# Altium PCB 灯带消消乐V1.0.PcbDoc
Units mm, origin at the board's own origin, x right, y up, seen from the top; angles counter-clockwise.
Board outline 80 x 65 mm, 2 copper layers (Top Layer, Bottom Layer), stack 1.571 mm thick; 87 components, 56 nets, 316 pads, 95 vias.
Unrouted connection lines stored in the file: 56.
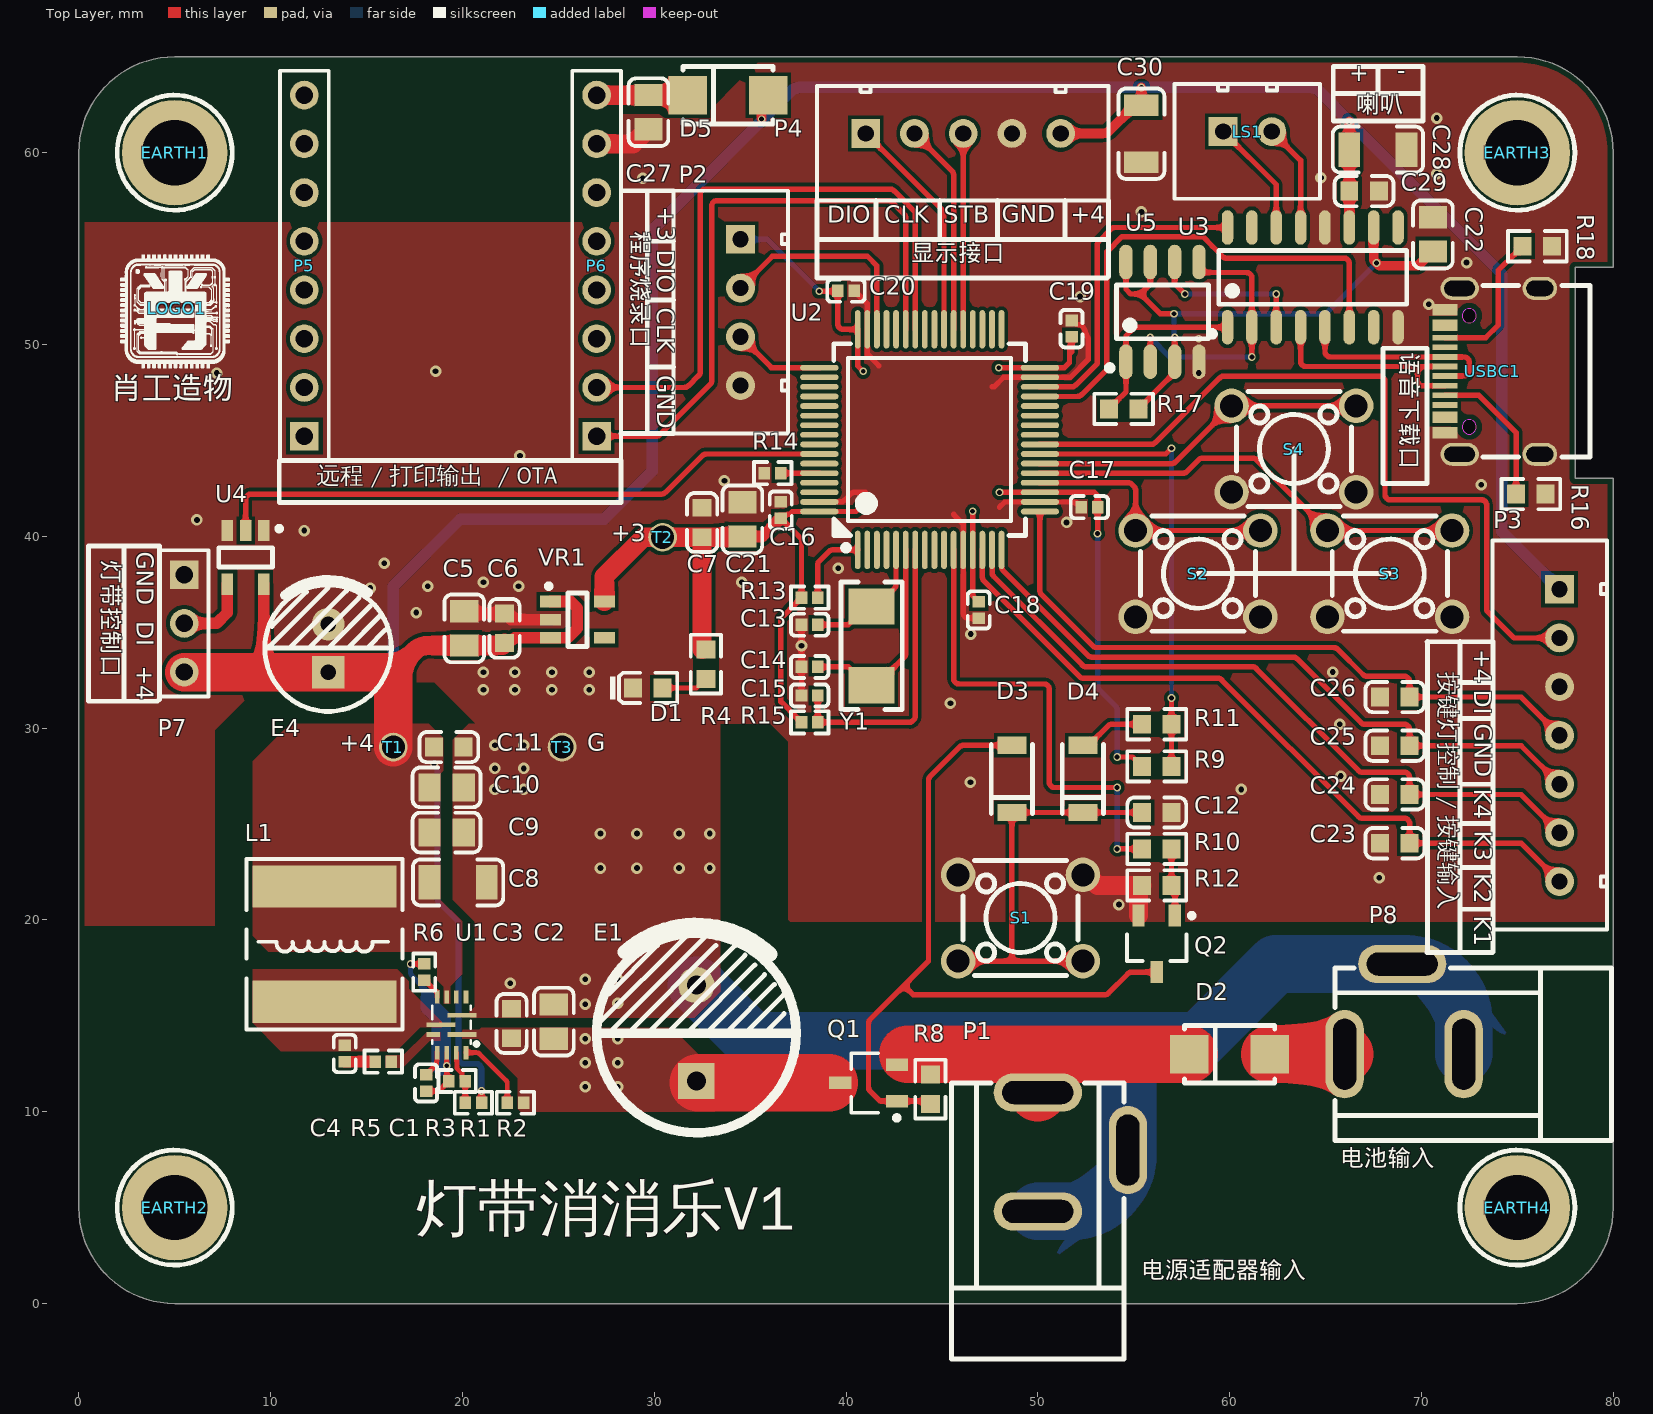
[diagram p0: Top Layer view]
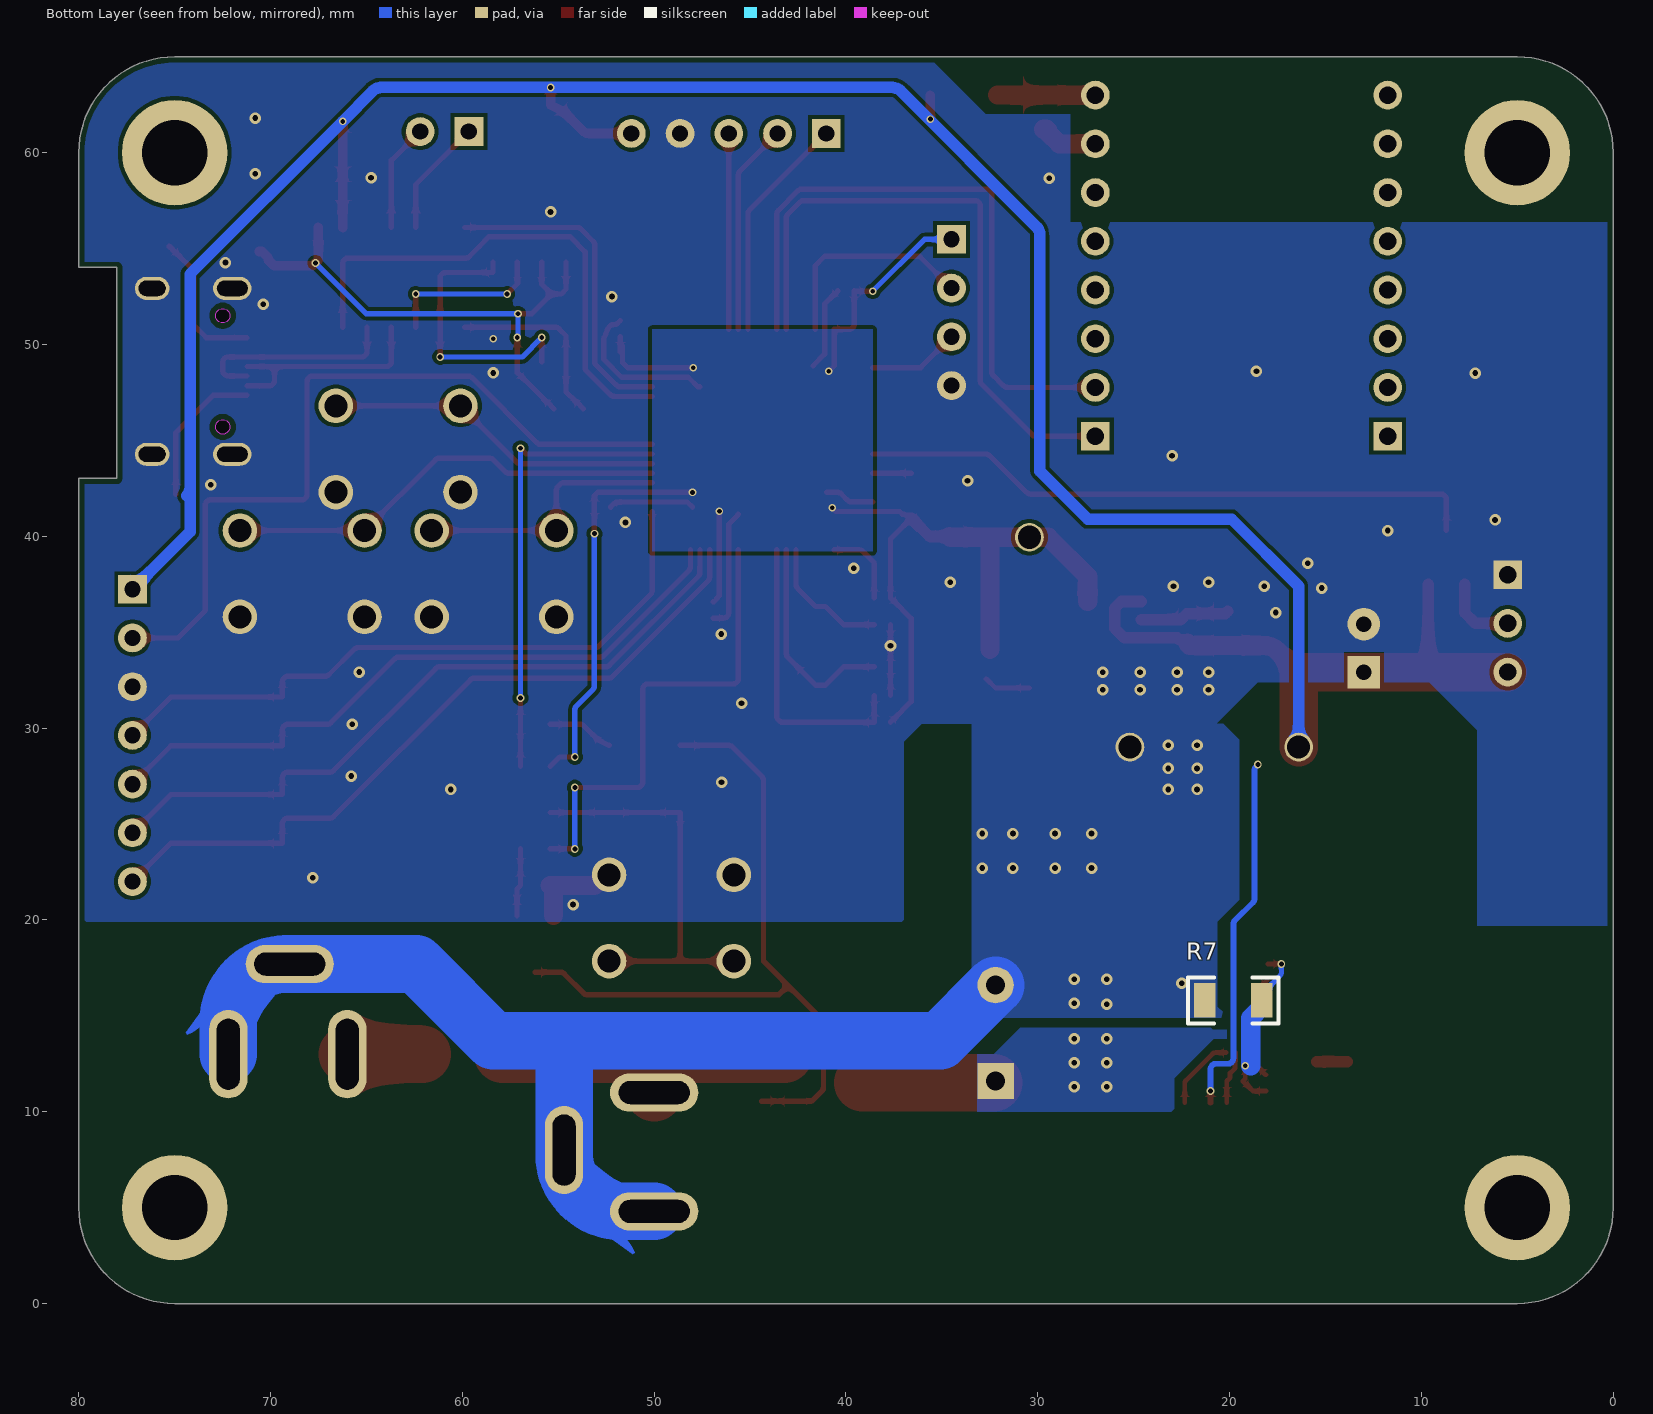
[diagram p1: Bottom Layer view, seen from below]
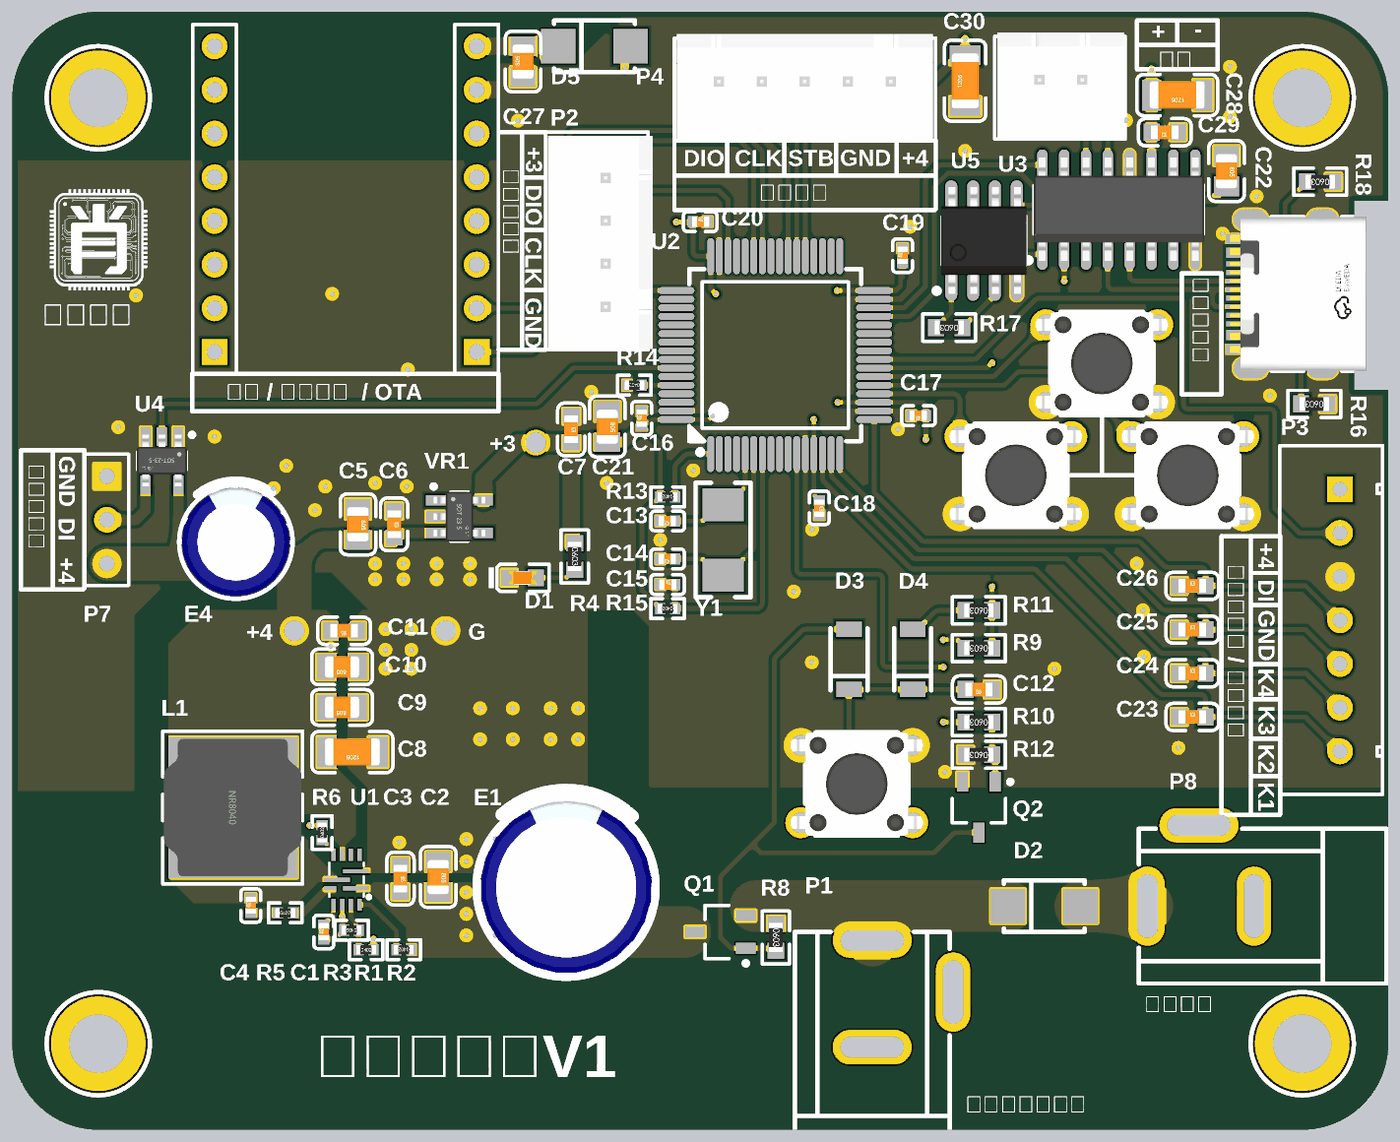
[diagram p2: 3D render of the assembled board from above, using the file's embedded part models]

## Layer stack, top to bottom
Top Solder: solder mask 0.0102, Solder Resist, Dk 3.5
Top Layer: signal copper 0.0356
Dielectric 1: dielectric 1.5, FR-4, Dk 4.8
Bottom Layer: signal copper 0.0356
Bottom Solder: solder mask 0.0102, Solder Resist, Dk 3.5

## Board outline
5,0 cw(c5,5) 0,5 0,60 cw(c5,60) 5,65 75,65 cw(c75,60) 80,60 80,54.015 78.015,54.015 78.015,43.015 80,43.015 80,5 cw(c75,5) 75,0

## Design rules (kind name [scope] priority, off if disabled: settings)
BoardOutlineClearance [All] p1: gap=0.3 ignorepadtopadclearanceinfootprint=FALSE
Clearance [All] p1: gap=0.2 ignorepadtopadclearanceinfootprint=TRUE except(0: Arc-Hole Track-Hole SMDPad-Hole THPad-Hole Via-Hole Text-Hole)
HoleSize [All] p1: absolutevalues=TRUE maxlimit=10 minlimit=0.025 maxpercent=80.000 minpercent=20.000
HoleToHoleClearance [All] p1: gap=0 allowstackedmicrovias=TRUE
MinimumSolderMaskSliver [All] p1: minsoldermaskwidth=0
PlaneConnect PlaneConnectPOWER [InNetClass('POWER')] p1: planeconnectstyle=Direct reliefexpansion=0.508 reliefentries=4 reliefconductorwidth=0.254 reliefairgap=0.254
PolygonConnect PolygonConnect_POWER [InNetClass('POWER')] p1: connectstyle=Direct reliefconductorwidth=0.254 reliefentries=4 polygonreliefangle="90 Angle" airgapwidth=0.254
PolygonConnect PolygonConnect_GND_Via [InNet('GND')] p2: thpad.connectstyle=Relief thpad.reliefconductorwidth=0.254 thpad.reliefentries=4 thpad.polygonreliefangle="90 Angle" thpad.airgapwidth=0.254 smdpad.connectstyle=Relief smdpad.reliefconductorwidth=0.254 smdpad.reliefentries=4 smdpad.polygonreliefangle="90 Angle" smdpad.airgapwidth=0.254 via.connectstyle=Direct via.reliefconductorwidth=0.254 via.reliefentries=4 via.polygonreliefangle="90 Angle" via.airgapwidth=0.254
PolygonConnect PolygonConnect_GNDA_Via [InNet('GNDA')] p3: thpad.connectstyle=Relief thpad.reliefconductorwidth=0.254 thpad.reliefentries=4 thpad.polygonreliefangle="90 Angle" thpad.airgapwidth=0.254 smdpad.connectstyle=Relief smdpad.reliefconductorwidth=0.254 smdpad.reliefentries=4 smdpad.polygonreliefangle="90 Angle" smdpad.airgapwidth=0.254 via.connectstyle=Direct via.reliefconductorwidth=0.254 via.reliefentries=4 via.polygonreliefangle="90 Angle" via.airgapwidth=0.254
PolygonConnect [All] p4: connectstyle=Relief reliefconductorwidth=0.254 reliefentries=4 polygonreliefangle="90 Angle" airgapwidth=0.254
RoomDefinition 灯带消消乐 [InComponentClass('灯带消消乐')] p1: confinementstyle=ConfineIn formatcopy=TRUE lockcomponents=FALSE outline -3.6,-3.9 82.8,-3.9 82.8,67.6 -3.6,67.6
RoutingVias [All] p1: holewidth=0.25 width=0.4 viastyle="Through Hole" minholewidth=0.2 minwidth=0.4 maxholewidth=1 maxwidth=5
SilkToSilkClearance [All] p1: silktosilkclearance=0
SilkToSolderMaskClearance [IsPad] p1: minsilkscreentomaskgap=0 clearancetoexposedcopper=TRUE
SolderMaskExpansion [All] p1: expansion=0.102 istentingtop=FALSE
SupplyNets "Schematic Supply Nets_5" [InNet('VIN')] p1: voltage=0.000
SupplyNets "Schematic Supply Nets_4" [InNet('+4.68V')] p2: voltage=0.000
SupplyNets "Schematic Supply Nets_3" [InNet('GNDA')] p3: voltage=0.000
SupplyNets "Schematic Supply Nets_2" [InNet('GND')] p4: voltage=0.000
SupplyNets "Schematic Supply Nets_1" [InNet('VBTA+')] p5: voltage=0.000
SupplyNets "Schematic Supply Nets" [InNet('+3V3')] p6: voltage=0.000
Width [All] p1: maxlimit=5 minlimit=0.254 preferedwidth=0.28 minimp=50.000000 maximp=50.000000 favimp=50.000000
24 further rules are at their usual default settings.

## Classes and differential pairs
net class POWER: +3V3 +4.68V GND GNDA NetC4_2 NetR5_2 PowerIn VIN

## Components (designator, comment, footprint, x,y, rotation, side; value= is the part's Value field where it differs from the comment)
C1 "2.2uF" 0402_C 18.11,11.5 r90 top
C2 "22uF/25V" 0805_C 24.767,14.695 r270 top
C3 "100nF" 0603_C 22.567,14.6 r270 top
C4 "100nF" 0402_C 13.865,13.035 r90 top
C5 "22uF/25V" 0805_C 20.1,35.2 r270 top
C6 "2.2uF" 0603_C 22.2,35.2 r270 top
C7 "2.2uF" 0603_C 32.5,40.72 r270 top
C8 "100uF/16V" 1206_C 19.775,21.955 r180 top
C9 "22uF/25V" 0805_C 19.175,24.555 r180 top
C10 "22uF/25V" 0805_C 19.175,26.91 r180 top
C11 "100nF" 0603_C 19.295,29.01 r180 top
C12 "100nF" 0603_C 56.2,25.6 r180 top
C13 "20pF" 0402_C 38.105,35.39 r180 top
C14 "20pF" 0402_C 38.105,33.19 r180 top
C15 "100nF" 0402_C 38.105,31.7 r0 top
C16 "100nF" 0402_C 36.6,41.365 r90 top
C17 "100nF" 0402_C 52.691,41.517 r180 top
C18 "100nF" 0402_C 46.919,36.16 r270 top
C19 "100nF" 0402_C 51.762,50.825 r90 top
C20 "100nF" 0402_C 40,52.8 r0 top
C21 "22uF/25V" 0805_C 34.6,40.88 r270 top
C22 "22uF/25V" 0805_C 70.6,55.739 r270 top
C23 "10nF" 0603_C 68.615,24 r0 top
C24 "10nF" 0603_C 68.615,26.54 r0 top
C25 "10nF" 0603_C 68.615,29.08 r0 top
C26 "10nF" 0603_C 68.615,31.62 r0 top
C27 "22uF/25V" 0805_C 29.7,62.11 r90 top
C28 "100uF/16V" 1206_C 67.73,60.16 r180 top
C29 "100nF" 0603_C 67.01,58 r180 top
C30 "100uF/16V" 1206_C 55.4,60.99 r90 top
D1 "白灯 0603" 0603_LED_S1 29.669,32.095 r0 top
D2 "SS54" SMA(DO-214AC)_S1 60,13 r0 top
D3 "1N4148" LL-34 48.65,27.35 r90 top
D4 "1N4148" LL-34 52.35,27.35 r90 top
D5 "SS54" SMA(DO-214AC)_S1 33.85,63 r0 top
E1 "470uF/35V" "CAP 5.0*10*12.5" 32.2,14.1 r90 top
E4 "220uF/16V" "CAP 2.5*6.3*11.2" 13,34.17 r90 top
EARTH1 "EARTH" "Mounting Hole 3.2" 5,60 r0 top
EARTH2 "EARTH" "Mounting Hole 3.2" 5,5 r90 top
EARTH3 "EARTH" "Mounting Hole 3.2" 75,60 r90 top
EARTH4 "EARTH" "Mounting Hole 3.2" 75,5 r90 top
L1 "2.2uH ±10%" NR8040 12.815,18.735 r270 top
LOGO1 "X-LOGO" XLOGO 5.1,51.9 r0 top
LS1 "Speaker" 2.54-2P 59.66,61.1 r270 top
P1 "DC005" DC005 50,11 r90 top
P2 "Debug" DEBUG 34.3,51.1 r180 top
P3 "Header 7" 2.54-7P 77.2,37.24 r180 top
P4 "Header 5" 2.54-5P 41.03,61 r270 top
P5 "Header 8" HDR1X8 11.76,45.22 r90 top
P6 "Header 8" HDR1X8 27,45.22 r90 top
P7 "Header 3" HDR1X3 5.5,38 r270 top
P8 "DC005" DC005 66,13 r180 top
Q1 "AO3401A" SOT-23-3L 41.175,11.5 r0 top
Q2 "AO3400A" SOT-23-3L 56.2,18.75 r90 top
R1 "62K" 0402_R 20.574,10.467 r0 top
R2 "100K" 0402_R 22.765,10.467 r180 top
R3 "10K" 0402_R 19.724,11.6 r180 top
R4 "2K" 0603_R 32.7,33.33 r270 top
R5 "10R" 0402_R 15.87,12.61 r0 top
R6 "NC" 0402_R 18.014,17.279 r90 top
R7 "0R" 1206_R 19.81,15.8 r0 bottom
R8 "20K" 0603_R 44.4,11.175 r270 top
R9 "20K" 0603_R 56.2,28 r180 top
R10 "100Ω" 0603_R 56.2,23.7 r180 top
R11 "100Ω" 0603_R 56.2,30.2 r180 top
R12 "20K" 0603_R 56.2,21.8 r180 top
R13 "100K" 0402_R 38.105,36.8 r180 top
R14 "10K" 0402_R 36.175,43.29 r180 top
R15 "1K" 0402_R 38.105,30.3 r180 top
R16 "5.1K" 0603_R 75.704,42.2 r180 top
R17 "5.1K" 0603_R 54.474,46.64 r180 top
R18 "5.1K" 0603_R 76.044,55.123 r180 top
S1 "KEY" SW-TH_4P-L6.0-W6.0-P4.50-LS6.5 49.1,20.1 r180 top
S2 "KEY" SW-TH_4P-L6.0-W6.0-P4.50-LS6.5 58.35,38.05 r0 top
S3 "KEY" SW-TH_4P-L6.0-W6.0-P4.50-LS6.5 68.35,38.05 r0 top
S4 "KEY" SW-TH_4P-L6.0-W6.0-P4.50-LS6.5 63.35,44.55 r0 top
T1 "Test Point" PLUG 16.4,29.01 r180 top
T2 "Test Point" PLUG 30.439,39.95 r180 top
T3 "Test Point" PLUG 25.2,29.01 r180 top
U1 "SCT2280FPAR" QFN-12_L2.0-W3.0-P0.50-BL 19.335,14.53 r90 top
U2 "STM32F103RCT6" LQFP-64_L10.0-W10.0-P0.50-LS12.0-BL 44.36,45.04 r0 top
U3 "wt2003h4-16s-a01" SOP-16_150mil 64.335,53.5 r0 top
U4 "sn74lvc1g125dbvr" SOT-23-5 8.7,38.9 r90 top
U5 "GD25Q16ETIGR" SOP-8_150mil 56.5,51.7 r0 top
USBC1 "TYPE-C-31-M-12" USB-C_SMD-TYPE-C-31-M-12 73.7,48.6 r90 top
VR1 "SPX3819-3V3" SOT-23-5 26,35.65 r180 top
Y1 "8MHz" SMD-5032_2P 41.33,34.29 r90 top

## Footprints (in the part's own frame and the unit in brackets; to place one, negate y for a bottom-side part, rotate by r counter-clockwise, add the part's x,y. Pads: shape width x height; smd on the part's side, far side on the other; paste and mask are expansions set on the pad)
2.54-2P [mm]
  rect 1.5x1.5 hole 0.85: 1(0,0)
  round 1.5 hole 0.85: 2(0,2.54)
  silkscreen extent -2.48,-2.53 3.5,5.04, body extent -2.7,-2.4 3.4,5, height 7
2.54-5P [mm]
  rect 1.5x1.5 hole 0.85: 1(0,0)
  round 1.5 hole 0.85: 2(0,2.54) 3(0,5.08) 4(0,7.62) 5(0,10.16)
  silkscreen extent -2.48,-2.53 3.5,12.66, body extent -2.7,-2.4 3.4,12.5, height 7
2.54-7P [mm]
  rect 1.5x1.5 hole 0.85: 1(0,0)
  round 1.5 hole 0.85: 2(0,2.54) 3(0,5.08) 4(0,7.62) 5(0,10.16) 6(0,12.7) 7(0,15.24)
  silkscreen extent -2.48,-2.53 3.5,17.74
0402_C [mm]
  rect 0.6x0.65 smd mask+0.051: 1(-0.425,0) 2(0.425,0)
  silkscreen extent -0.97,-0.58 0.97,0.58, body extent -0.48,-0.3 0.52,0.3, height 0.2
0402_R [mm]
  rect 0.6x0.65 smd mask+0.051: 1(-0.425,0) 2(0.425,0)
  silkscreen extent -0.97,-0.58 0.97,0.58, body extent -0.57,-0.27 0.58,0.28, height 0.41
0603_C [mm]
  rect 0.93x0.98 smd: 1(-0.77,0) 2(0.77,0)
  silkscreen extent -1.53,-0.79 1.54,0.79, body extent -0.8,-0.4 0.8,0.4, height 0.3
0603_LED_S1 [mm]
  rect 0.93x0.98 smd: A(0.77,0) K(-0.77,0)
  silkscreen extent -1.97,-0.79 1.54,0.79, body extent -0.8,-0.4 0.8,0.4, height 0.6
0603_R [mm]
  rect 0.93x0.98 smd: 1(-0.77,0) 2(0.77,0)
  silkscreen extent -1.53,-0.79 1.54,0.79, body extent -0.85,-0.4 0.85,0.4, height 0.56
0805_C [mm]
  rect 1.16x1.47 smd: 1(-0.89,0) 2(0.89,0)
  silkscreen extent -1.77,-1.04 1.77,1.04, body extent -1,-0.62 1,0.63, height 0.77
1206_C [mm]
  rect 1.13x1.8 smd: 1(-1.49,0) 2(1.49,0)
  silkscreen extent -2.36,-1.2 2.35,1.2, body extent -1.6,-0.81 1.6,0.79, height 1
1206_R [mm]
  rect 1.13x1.8 smd: 1(-1.49,0) 2(1.49,0)
  silkscreen extent -2.36,-1.2 2.35,1.2, body extent -1.7,-0.86 1.65,0.87, height 0.85
"CAP 2.5*6.3*11.2" [mm] "脚距2.5mm直径6.3mm高度11.2mm"
  rect 1.7x1.7 hole 0.8: A(-1.25,0)
  round 1.7 hole 0.8: K(1.25,0)
  silkscreen extent -3.3,-3.3 3.56,3.3, body extent -3.15,-3.15 3.16,3.15, height 11.23
"CAP 5.0*10*12.5" [mm] "脚距5mm直径10mm高度12.5mm"
  rect 1.9x1.9 hole 1: A(-2.5,0)
  round 1.9 hole 1: K(2.5,0)
  silkscreen extent -5.2,-5.2 5.64,5.2, body extent -5,-5.01 5.01,4.99, height 12.55
DC005 [mm]
  oval 2x4.6 hole 1.2 slot 3.7 at 90 deg: 1(0,0) 2(-6.2,0)
  oval 4.6x2 hole 1.2 slot 3.7 at 0 deg: 3(-3,-4.7)
  silkscreen extent -13.9,-4.5 0.5,4.5
DEBUG [mm]
  rect 1.5x1.5 hole 0.85: 1(-0.2,-4.38)
  round 1.5 hole 0.85: 2(-0.2,-1.84) 3(-0.2,0.7) 4(-0.2,3.24)
  silkscreen extent -2.68,-6.91 3.3,5.74, body extent -2.95,-6.7 3.15,5.7, height 7.15
HDR1X3 [mm] "Connector; Header; 3 Position"
  rect 1.5x1.5 hole 0.9: 1(0,0)
  round 1.5 hole 0.9: 2(2.54,0) 3(5.08,0)
  silkscreen extent -1.27,-1.27 6.35,1.27
HDR1X8 [mm] "Connector; Header; 8 Position"
  rect 1.5x1.5 hole 0.9: 1(0,0)
  round 1.5 hole 0.9: 2(2.54,0) 3(5.08,0) 4(7.62,0) 5(10.16,0) 6(12.7,0) 7(15.24,0) 8(17.78,0)
  silkscreen extent -1.27,-1.27 19.05,1.27
LL-34 [mm]
  rect 0.9x1.5 smd: 1(1.75,0) 2(-1.75,0)
  silkscreen extent -1.8,-1.08 1.8,1.08
LQFP-64_L10.0-W10.0-P0.50-LS12.0-BL [mm]
  oval 0.3x2 smd paste+0.051: 1(-3.75,-5.75) 2(-3.25,-5.75) 3(-2.75,-5.75) 4(-2.25,-5.75) 5(-1.75,-5.75) 6(-1.25,-5.75) 7(-0.75,-5.75) 8(-0.25,-5.75) 9(0.25,-5.75) 10(0.75,-5.75) 11(1.25,-5.75) 12(1.75,-5.75) 13(2.25,-5.75) 14(2.75,-5.75) 15(3.25,-5.75) 16(3.75,-5.75) 33(3.75,5.75) 34(3.25,5.75) 35(2.75,5.75) 36(2.25,5.75) 37(1.75,5.75) 38(1.25,5.75) 39(0.75,5.75) 40(0.25,5.75) 41(-0.25,5.75) 42(-0.75,5.75) 43(-1.25,5.75) 44(-1.75,5.75) 45(-2.25,5.75) 46(-2.75,5.75) 47(-3.25,5.75) 48(-3.75,5.75)
  oval 2x0.3 smd paste+0.051: 17(5.75,-3.75) 18(5.75,-3.25) 19(5.75,-2.75) 20(5.75,-2.25) 21(5.75,-1.75) 22(5.75,-1.25) 23(5.75,-0.75) 24(5.75,-0.25) 25(5.75,0.25) 26(5.75,0.75) 27(5.75,1.25) 28(5.75,1.75) 29(5.75,2.25) 30(5.75,2.75) 31(5.75,3.25) 32(5.75,3.75) 49(-5.75,3.75) 50(-5.75,3.25) 51(-5.75,2.75) 52(-5.75,2.25) 53(-5.75,1.75) 54(-5.75,1.25) 55(-5.75,0.75) 56(-5.75,0.25) 57(-5.75,-0.25) 58(-5.75,-0.75) 59(-5.75,-1.25) 60(-5.75,-1.75) 61(-5.75,-2.25) 62(-5.75,-2.75) 63(-5.75,-3.25) 64(-5.75,-3.75)
  silkscreen extent -5,-5.79 5,5
"Mounting Hole 3.2" [mm]
  round 5.5 hole 3.4: 1(0,0)
  silkscreen extent -3,-3 3,3, body extent -2.8,-2.8 2.8,2.8, height 2.68
NR8040 [mm] "80*80*40电感"
  rect 2.2x7.5 smd: 1(-3,0) 2(3,0)
  silkscreen extent -4.45,-4.06 4.45,4.06, body extent -4,-4 4,4, height 4.1
PLUG [mm]
  round 1.5 hole 1.2: 1(0,0)
QFN-12_L2.0-W3.0-P0.50-BL [mm]
  rect 0.25x1.5 smd: 1(-0.5,-0.65) 2(0.5,-0.65) 7(0,0.45)
  rect 0.7x0.25 smd: 3(1.45,-0.85) 4(1.45,-0.35) 5(1.45,0.15) 6(1.45,0.65) 9(-1.45,0.65) 10(-1.45,0.15) 11(-1.45,-0.35) 12(-1.45,-0.85)
  rect 0.25x0.7 smd: 8(-0.5,0.85)
  silkscreen extent -1.07,-1.47 0.99,0.9
SMA(DO-214AC)_S1 [mm]
  rect 2x2 smd: 1(2.1,0) 2(-2.1,0)
  silkscreen extent -2.35,-1.5 2.35,1.5
SMD-5032_2P [mm]
  rect 1.9x2.4 smd: 1(-2.05,0) 2(2.05,0)
  silkscreen extent -3.32,-1.6 3.32,1.6
SOP-8_150mil [mm]
  oval 0.7x1.8 smd: 1(-1.905,-2.6) 2(-0.635,-2.6) 3(0.635,-2.6) 4(1.905,-2.6) 5(1.905,2.6) 6(0.635,2.6) 7(-0.635,2.6) 8(-1.905,2.6)
  silkscreen extent -2.9,-3.07 2.4,1.4, body extent -2.5,-3.1 2.5,3.1, height 1.75
SOP-16_150mil [mm]
  oval 0.6x1.8 smd: 1(-4.445,-2.6) 2(-3.175,-2.6) 3(-1.905,-2.6) 4(-0.635,-2.6) 5(0.635,-2.6) 6(1.905,-2.6) 7(3.175,-2.6) 8(4.445,-2.6) 9(4.445,2.6) 10(3.175,2.6) 11(1.905,2.6) 12(0.635,2.6) 13(-0.635,2.6) 14(-1.905,2.6) 15(-3.175,2.6) 16(-4.445,2.6)
  silkscreen extent -5.4,-3.1 4.9,1.4, body extent -4.95,-2.97 4.95,3.03, height 1.75
SOT-23-3L [mm] "http://www.aosmd.com/res/packaging_information/SOT-23-3L.pdf"
  rect 1.15x0.65 smd: 1(1.475,-0.95) 2(1.475,0.95) 3(-1.475,0)
  silkscreen extent -0.9,-1.95 1.6,1.55, body extent -0.9,-1.55 0.9,1.55, height 1.25
SOT-23-5 [mm]
  rect 1.1x0.6 smd: 1(1.4,-0.95) 2(1.4,0) 3(1.4,0.95) 4(-1.4,0.95) 5(-1.4,-0.95)
  silkscreen extent -0.5,-1.88 1.62,1.4, body extent -1.5,-1.45 1.51,1.45, height 1.25
SW-TH_4P-L6.0-W6.0-P4.50-LS6.5 [mm]
  round 1.8 hole 1.2: 1(-3.25,2.25) 2(3.25,2.25) 3(-3.25,-2.25) 4(3.25,-2.25)
  silkscreen extent -3,-3 3,3, body extent -4.11,-3 4.11,3, height 4.9
USB-C_SMD-TYPE-C-31-M-12 [mm]
  oval 1.2x2 hole 0.8 slot 1.6 at 90 deg: 0(-4.325,1.706) 1(4.325,1.706)
  oval 1.2x1.8 hole 0.8 slot 1.4 at 90 deg: 2(4.325,-2.474) 3(-4.325,-2.474)
  rect 0.3x1.3 smd paste-100 mask+0.051: A1(-3.35,2.474) A4(-2.55,2.474) A5(-1.25,2.474) A6(-0.25,2.474) A7(0.25,2.474) A8(1.25,2.474) A9(2.55,2.474) A12(3.35,2.474) B1(3.05,2.474) B4(2.25,2.474) B5(1.75,2.474) B6(0.75,2.474) B7(-0.75,2.474) B8(-1.75,2.474) B9(-2.25,2.474) B12(-3.05,2.474)
  Keep-Out Layer board cut-out: 2.9,1.581 2.826,1.579 2.69,1.521 2.587,1.416 2.531,1.28 2.531,1.132 2.587,0.995 2.69,0.89 2.826,0.832 2.9,0.831 2.974,0.832 3.109,0.89 3.213,0.995 3.269,1.132 3.269,1.279 3.213,1.416 3.109,1.521 2.974,1.579 2.9,1.581 2.9,1.581
  Keep-Out Layer board cut-out: -2.9,1.581 -2.974,1.579 -3.109,1.521 -3.213,1.416 -3.269,1.28 -3.269,1.132 -3.213,0.995 -3.109,0.89 -2.974,0.832 -2.9,0.831 -2.826,0.832 -2.691,0.89 -2.587,0.995 -2.531,1.132 -2.531,1.279 -2.587,1.416 -2.69,1.521 -2.826,1.579 -2.9,1.581 -2.9,1.581
  Multi-Layer pour cut-out: 2.9,1.581 2.826,1.579 2.69,1.521 2.587,1.416 2.531,1.28 2.531,1.132 2.587,0.995 2.69,0.89 2.826,0.832 2.9,0.831 2.974,0.832 3.109,0.89 3.213,0.995 3.269,1.132 3.269,1.279 3.213,1.416 3.109,1.521 2.974,1.579 2.9,1.581 2.9,1.581
  Multi-Layer pour cut-out: -2.9,1.581 -2.974,1.579 -3.109,1.521 -3.213,1.416 -3.269,1.28 -3.269,1.132 -3.213,0.995 -3.109,0.89 -2.974,0.832 -2.9,0.831 -2.826,0.832 -2.691,0.89 -2.587,0.995 -2.531,1.132 -2.531,1.279 -2.587,1.416 -2.69,1.521 -2.826,1.579 -2.9,1.581 -2.9,1.581
  silkscreen extent -4.47,-5.09 4.47,0.49, body extent -4.47,-5 4.47,2.9, height 3.25
XLOGO [mm]
  silkscreen extent -2.93,-3.11 2.77,2.8

## Part data
C1 C2 C3 C4 C5 C6 C7 C8 C9 C10 C11 C12 C13 C14 C15 C16 C17 C18 C19 C20 C21 C22 C23 C24 C25 C26 C27 C28 C29 C30: library part Cap, "贴片电容"
D1: library part "0603 绿灯", "发光二极管", Package=0603, SuppliersPartNumber=C72043, ComponentLink1Description=供应商链接, ComponentLink1URL=http://www.szlcsc.com/product/details_73152.html, Supplier=LC
D2 D3 D4 D5: library part "SMA(DO-214AC) SS54", "二极管", Package=SMA(DO-214AC), SuppliersPartNumber=C22452, ComponentLink1Description=供应商链接, ComponentLink1URL=http://www.szlcsc.com/product/details_23178.html, Supplier=LC
E1 E4: library part ECAP, "电解电容"
EARTH1 EARTH2 EARTH3 EARTH4: library part "Mounting Hole"
L1: library part "1206 10uH 10%", "贴片电感", Package=1206, SuppliersPartNumber=C1051, ComponentLink1Description=供应商链接, ComponentLink1URL=http://www.szlcsc.com/product/details_1403.html, Supplier=LC
LOGO1: library part LOGO
LS1: "Loudspeaker", LatestRevisionDate=17-Jul-2002, LatestRevisionNote="Re-released for DXP Platform.", PackageReference=PIN2, Published=24-Mar-1999, Publisher="Altium Limited"
P2: library part "Header 4", "Header, 4-Pin", LatestRevisionDate=17-Jul-2002, LatestRevisionNote="Re-released for DXP Platform.", Publisher="Altium Limited"
P3: "Header, 7-Pin", LatestRevisionDate=17-Jul-2002, LatestRevisionNote="Re-released for DXP Platform.", Publisher="Altium Limited"
P4: "Header, 5-Pin", LatestRevisionDate=17-Jul-2002, LatestRevisionNote="Re-released for DXP Platform.", Publisher="Altium Limited"
P5 P6: "Header, 8-Pin", LatestRevisionDate=17-Jul-2002, LatestRevisionNote="Re-released for DXP Platform.", Publisher="Altium Limited"
P7: "Header, 3-Pin", LatestRevisionDate=17-Jul-2002, LatestRevisionNote="Re-released for DXP Platform.", Publisher="Altium Limited"
Q1: library part "AO3401A P道沟 X13A15 SOT-23", "MOS(场效应管)", Package=SOT-23, SuppliersPartNumber=C15127, ComponentLink1Description=供应商链接, ComponentLink1URL=http://www.szlcsc.com/product/details_15801.html, Supplier=LC
Q2: library part "AO3400A N道沟 X0YV1T SOT-23", "MOS(场效应管)", Package=SOT-23, SuppliersPartNumber=C20917, ComponentLink1Description=供应商链接, ComponentLink1URL=http://www.szlcsc.com/product/details_21629.html, Supplier=LC
R1 R2 R3 R4 R5 R6 R7 R8 R9 R10 R11 R12 R13 R14 R15 R16 R17 R18: library part Res, "贴片电阻"
S1 S2 S3 S4: library part SWITCH
U1: "功能类型:降压型;工作电压:4.5V~18V;输出电压:600mV~7V;输出电流:8A;输出类型:可调;", Frequency - Switching=400kHz~1.2MHz, JLCPCB Part Class="Extended Part", LCSC Part Name="降压型 8A 4.5V~18V", Manufacturer=SCT(芯洲科技), Operating Temperature=-40℃~+125℃, Output Current=8A, Output Voltage=600mV~7V, Quiescent Current=130uA, Voltage - Supply=4.5V~18V, AddInBom=yes, ConvertToPcb=yes, Datasheet=https://item.szlcsc.com/datasheet/SCT2280FPAR/994012.html, Features=轻载高效模式；内置LDO稳压器；逐波限流；过流保护；输出放电；工作状态指示；打嗝限流, FootprintName=QFN-12_L2.0-W3.0-P0.50-BL, Function=降压型, ManufacturerPart=SCT2280FPAR, ModelId=0ae59447a7924f2e9e6865042a3e138b, ModelName=QFN-12_L2.0-W3.0-P0.50-BL, ModelTransform=118.8974,80.3148,0,0,0,0,0,-4.016,0, Number of Outputs=1, Output Type=可调, Supplier=LCSC, Supplier Footprint=QFN-12(2x3), SupplierPart=C918192, Switch tube (built-in/external)=内置, Symbol=SCT2280FPAR, Synchronous Rectifier=是, Topology=降压式
U2: "CPU内核:ARM-M3;CPU最大主频:72MHz;应用领域:-;", JLCPCB Part Class="Extended Part", LCSC Part Name="主流增强型ARM Cortex-M3 MCU，具有256 KB Flash、72 MHz CPU、电机控制、USB和CAN", Manufacturer=ST(意法半导体), Voltage - Supply=2V~3.6V, ADC (Bit)=12bit, AddInBom=yes, Applications=-, ConvertToPcb=yes, CPU Core=ARM-M3, CPU Maximum Speed=72MHz, DAC (Bit)=12bit, Datasheet=https://item.szlcsc.com/datasheet/STM32F103RCT6/8815.html, Device=STM32F103RCT6, FootprintName=LQFP-64_L10.0-W10.0-P0.50-LS12.0-BL, ManufacturerPart=STM32F103RCT6, ModelId=cd9de06618c44fcf82654c43a457f83c, ModelName=LQFP-64_L10.0-W10.0-H1.4-LS12.0-P0.50, ModelTransform=472.441,472.441,0,0,0,0,0,0,0, Number of I/O=51, Program Memory Type=FLASH, Program Storage Size=256KB, Supplier=LCSC, Supplier Footprint=LQFP-64(10x10), SupplierPart=C8323, Symbol=STM32F103RCT6
U3: library part wt2003h4-16s-a04, "WT2003HX是一款功能强大的高品质语音芯片，采用了高性能32位处理器、最高频率可达120MHz。标准UART通信方式，具有低成本、低功耗、高可靠性、通用性强等特点，可内置350秒语音容量。可通过下载器或者MCU更新语音bin文件，实现语音OTA功能。可搭配 WT WriterV 下载器（适配WT2003H系列、WTV380/WTV890系列、WT3000T系列、WTK6900系列、WT2605A系列、WT2605C系列芯片，实现语音 / 程序的下载与更换）及 WTV-VSB 测试板（适配 WTV 系列", JLCPCB Part Class="Extended Part", LCSC Part Name=WT2003H4-16S-A04, Manufacturer=WT(唯创知音), AddInBom=yes, ConvertToPcb=yes, Datasheet=https://item.szlcsc.com/datasheet/WT2003H4-16S-A04/59048000.html, FootprintName=SOP-16_L10.0-W4.0-P1.27-LS6.0-BL, ManufacturerPart=WT2003H4-16S-A04, ModelId=ee0e272ebf01490fae8942030b5217f4, ModelName=SOP-16_L10.0-W4.0-P1.27-LS6.0-BL, ModelTransform=393.7,236.22,0,0,0,0,0,0,0, Supplier=LCSC, Supplier Footprint=SOP-16, SupplierPart=C55213602, SymbolName=WT2003H4-16S-A04
U4: "输入类型:-;工作电压:1.65V~5.5V;元件数:1;每个元件位数:1;灌电流(IOL):32mA;拉电流(IOH):32mA;", Current - Output High(IOH)=32mA, JLCPCB Part Class="Extended Part", LCSC Part Name=单总线缓冲门，带三态输出, Manufacturer=TI(德州仪器), ManufacturerPart=SN74LVC1G125DBVR, Operating Temperature=-40℃~+125℃, Quiescent Current=10uA, Voltage - Supply=1.65V~5.5V, AddInBom=yes, Channel Type=单向, ConvertToPcb=yes, Current - Output Low(IOL)=32mA, Datasheet=https://www.ti.com/cn/lit/ds/symlink/sn74lvc1g125.pdf, Features=掉电隔离；输出使能, FootprintName=SOT-23-5_L3.0-W1.7-P0.95-LS2.8-BL, Input type=-, Logic Family=74LVC, ModelId=0a2a1b8f50944f73965918ad6e5fe167, ModelName=SOT-23-5_L2.9-W1.6-H1.1-LS2.8-P0.95, ModelTransform=118.60433,114.173,0,90,0,0,0.0005,0.0005,0, Number of Bits per Element=1, Number of Elements=1, Output Type=三态, Propagation Delay=3.7ns@3.3V,15pF, Supplier=LCSC, Supplier Footprint=SOT-23-5, SupplierPart=C23654, Symbol=SN74LVC1G125DBVR
U5: library part W25Q128FVSIG_[C35101], "Flash ROM", Package=SOIC-8, SuppliersPartNumber=C35101, ComponentLink1Description=供应商链接, ComponentLink1URL=http://www.szlcsc.com/product/details_36072.html, Supplier=LC
USBC1: Current Rating - Power (Max)=5A, JLCPCB Part Class="Extended Part", LCSC Part Name="Type-C 母", Manufacturer=韩国韩荣, Operating Temperature Range=-, Add into BOM=yes, Connector Type=Type-C, Contact Material=-, Contact Plating=-, Convert to PCB=yes, Datasheet=https://atta.szlcsc.com/upload/public/pdf/source/20220525/466408E853115E789EDB0DDC29077C05.pdf, Device=TYPE-C-31-M-12, Gender=母, Manufacturer Part=TYPE-C-31-M-12, Mounting Style=-, Name=TYPE-C-31-M-12, Number of Contacts=16P, Number of Ports=1, Standard=-, Supplier=LCSC, Supplier Footprint=SMD, Supplier Part=C165948, Symbol=TYPE-C-31-M-12, Welding Temperature (Max)=-
VR1: library part SPX3819, "LDO-3.3V"
Y1: library part "SMD-5032_2P 8MHz 20ppm 20pF", "贴片晶振", Package=SMD-5032_2P, SuppliersPartNumber=C115962, ComponentLink1Description=供应商链接, ComponentLink1URL=http://www.szlcsc.com/product/details_117214.html, Supplier=LC

## Via types
v1: diameter 0.6, hole 0.3, Top Layer to Bottom Layer, 68 vias
v2: diameter 0.4, hole 0.25, Top Layer to Bottom Layer, 27 vias

## Nets (pads, with @x,y where several pads share a name; then routed paths per layer and width w, separated by ;. In a path a pad name is that pad's centre, name@x,y a point inside that pad or via, vN(x,y) a via of type N, cw(c..) or ccw(c..) an arc to the next point about the centre after c; other vN are vias at no path point)
+3V3: C7.2 C16.1 C17.1 C18.1 C19.1 C20.1 C21.2 P2.1 R4.1 R9.2 R13.2 R15.2 T2.1 U2.13 U2.19 U2.32 U2.48 U2.64 VR1.5 | length 76.6
  Top Layer w0.28: R15.2 37.68,30.325 37.52,30.485 37.495,30.485 36.6,31.38 36.6,35.72 37.495,36.615 37.52,36.615 37.68,36.775 R13.2 37.68,39.86 36.785,40.755 36.785,40.78 36.625,40.94 C16.1 36.76,41.1 36.899,41.1 36.949,41.15 37.066,41.15 37.206,41.29 U2.64 40.516,41.29 v2(40.716,41.49) ; v2(38.61,52.775) 39.55,52.775 C20.1 39.575,51.07 ccw(c39.855,51.07) 39.855,50.79 U2.48 40.61,48.89 v2(40.9,48.6) ; v2(46.6,41.3) 46.61,41.29 U2.13 46.61,36.909 46.734,36.785 46.734,36.745 46.894,36.585 C18.1 ; v2(47.96,48.79) U2.32 51.39,48.79 51.649,49.049 51.649,49.494 ; v2(48.004,42.29) U2.19 52.952,42.29 53.116,42.126 C17.1 v2(53.116,40.14) ; 51.649,49.94 51.649,49.494 ; C19.1 51.762,49.607 51.649,49.494 ; v2(54.136,28.49) 54.94,28.49 R9.2
  Top Layer w0.6: C21.2 35.65,39.99 36.575,40.915 36.575,40.94 C16.1
  Top Layer w1: VR1.5 27.4,37.9 29.45,39.95 T2.1 C7.2 ; R4.1@32.5,34.1 C7.2 ; C21.2 34.56,39.95 C7.2
  Bottom Layer w0.28: P2.1 35.905,55.48 v2(38.61,52.775) ; v2(53.116,40.14) 53.116,32.2 ccw(c53.396,32.2) 53.197,32.003 54.055,31.145 cw(c53.856,30.948) 54.136,30.948 v2(54.136,28.49)
+4.68V: C5.2 C6.2 C8.2 C9.2 C10.2 C11.2 C28.2 C29.2 C30.2 D5.1 E4.A L1.1 P3.1 P4.5 P7.3 R1.2 T1.1 U1.5 U3.11 U4.5 VR1.1 VR1.3 | length 170.4
  Top Layer w0.3: R1.2 v2(20.999,11.083)
  Top Layer w0.5: v2(35.6,61.75) D5.1@35.6,63 ; P4.5 53.378,61 ccw(c53.378,61.5) 53.731,61.146 54.75,62.165 C30.2 v2(55.4,63.4) ; U3.11 C29.2 C28.2 v2(66.24,61.63)
  Top Layer w0.6: 9.65,32.92 U4.5 ; C6.2 22.365,34.595 22.636,34.595 22.741,34.7 VR1.3 25.5,34.7 26,35.2 26,36.249 25.649,36.6 VR1.1
  Top Layer w1: 16.4,32.92 17.498,34.018 cw(c18.204,33.31) 18.204,34.31 C5.2 22.08,34.31 C6.2
  Top Layer w2: P7.3 9.65,32.92 E4.A 16.4,32.92 T1.1
  Bottom Layer w0.3: v2(18.525,28.1) 18.612,28.013 cw(c18.4,27.801) 18.7,27.801 18.7,21.123 ccw(c19,21.124) 18.787,20.913 19.712,19.988 cw(c19.5,19.776) 19.8,19.777 ; 19.8,19.776 19.8,12.798 ccw(c20.1,12.799) 20.098,12.499 20.7,12.499 cw(c20.699,12.199) 20.999,12.199 v2(20.999,11.083)
  Bottom Layer w0.6: T1.1 16.4,37.4 19.9,40.9 27.4,40.9 29.9,43.4 29.9,55.721 cw(c30.5,55.721) 30.075,56.145 37.155,63.225 cw(c37.579,62.8) 37.579,63.4 v2(55.4,63.4) 64.248,63.4 cw(c64.248,62.8) 64.676,63.221 v2(66.24,61.63) 74.2,53.67 74.2,42.531 ; 74.375,42.108 cw(c74.8,42.531) 74.2,42.531 ; P3.1 74.2,40.24 74.2,42.531
DP+: U3.5 USBC1.A6 USBC1.B6 | length 11
  Top Layer w0.28: U3.5 64.97,49.63 ccw(c65.25,49.63) 65.25,49.35 72.214,49.35 cw(c72.214,49.07) 72.494,49.07 72.494,48.638 cw(c72.214,48.638) 72.214,48.358 USBC1.A6@71.233,48.358
DP-: U3.4 USBC1.A7 USBC1.B7 | length 11.8
  Top Layer w0.28: U3.4 63.7,49.13 ccw(c63.98,49.13) 63.979,48.85 69.794,48.85 ; USBC1.B7 70.074,47.85 cw(c70.074,48.13) 69.794,48.13 69.794,48.85 ; USBC1.A7 69.794,48.85
Flash_CLK: U3.3 U5.6 | length 8.4
  Top Layer w0.28: U5.6 57.135,53.165 v2(57.668,52.632) ; U3.3 v2(62.43,52.632)
  Bottom Layer w0.28: v2(57.668,52.632) v2(62.43,52.632)
Flash_CS: R17.2 U3.1 U5.1 | length 9.7
  Top Layer w0.28: R17.2 53.704,46.665 54.029,46.99 54.054,46.99 54.595,47.531 U5.1 54.595,50.455 54.958,50.818 cw(c55.156,50.62) 55.156,50.9 U3.1
Flash_DO: U3.2 U5.2 U5.5 | length 14.6
  Top Layer w0.28: U5.2 v2(55.865,50.36) ; U5.5 58.405,53.75 60.88,53.75 cw(c60.88,53.47) 61.16,53.47 U3.2 v2(61.16,49.35)
  Bottom Layer w0.28: v2(55.865,50.36) 56.875,49.35 v2(61.16,49.35)
GND: C2.1 C3.1 C5.1 C6.1 C7.1 C8.1 C9.1 C10.1 C11.1 C12.1 C13.2 C14.2 C15.1 C16.2 C17.2 C18.2 C19.2 C20.2 C21.1 C22.1 C23.1 C24.1 C25.1 C26.1 C27.1 C28.1 C29.1 C30.1 D1.K E1.K E4.K P1.2 P1.3 P2.4 P3.3 P4.4 P6.7 P7.1 P8.2 P8.3 Q2.2 R7.2 R12.2 R14.2 R16.1 R18.1 S1.3 S1.4 S2.3 S2.4 S3.3 S3.4 S4.3 S4.4 T3.1 U1.2 U2.12 U2.18 U2.31 U2.47 U2.63 U3.8 U3.12 U4.1 U4.3 U5.4 USBC1.0 USBC1.1 USBC1.2 USBC1.3 USBC1.A1 USBC1.A12 USBC1.B1 USBC1.B12 VR1.2 | length 100.9
  Top Layer w0.28: C15.1 C14.2 C13.2 ; U2.63 cw(c38.656,41.514) 38.656,41.794 39.718,41.794 ccw(c39.718,42.074) 39.915,41.876 40.248,42.208 cw(c40.446,42.01) 40.446,42.29 41.001,42.29 ; C20.2 40.425,52.775 40.585,52.615 40.61,52.615 41.11,52.115 U2.47 41.11,49.496 41.716,48.89 ; 45.61,41.14 46.11,40.64 U2.12 46.11,36.015 ccw(c46.39,36.015) 46.39,35.735 C18.2 ; 47.61,47.79 47.724,47.79 48.224,48.29 U2.31 51.699,48.29 52.624,49.215 52.624,50.272 ccw(c52.344,50.272) 52.6,50.386 52.397,50.839 ccw(c52.087,50.7) 52.087,51.04 cw(c52.088,51.32) 51.928,51.09 C19.2 ; 48.004,41.517 48.277,41.79 U2.18 51.992,41.79 52.081,41.702 52.106,41.702 52.266,41.542 C17.2
  Top Layer w0.6: C5.1 20.22,35.97 C6.1 22.225,35.97 22.545,35.65 VR1.2
  Top Layer w1: P6.7 28.879,60.46 29.465,61.046 29.465,61.14 29.545,61.22 C27.1 ; S1.3 52.566,22.35 53.116,21.8 R12.2 55.25,21.62 Q2.2
  Bottom Layer w3: E1.K 35.1,13.7 54.7,13.7 ; P1.2 51.7,4.8 ccw(c51.7,7.8) 54.7,7.8 54.7,13.7 ; P8.2 72.2,14.7 ccw(c69.2,14.7) 69.2,17.7 62.4,17.7 58.4,13.7 54.7,13.7
  other v1: 26.4,15.6 28.1,15.65 22.5,16.7 26.4,16.9 28.1,16.9 54.231,20.8 67.8,22.2 27.2,22.7 29.1,22.7 31.3,22.7 32.9,22.7 27.2,24.5 29.1,24.5 31.3,24.5 32.9,24.5 21.7,26.8 23.2,26.8 60.6,26.8 46.487,27.177 65.8,27.5 21.7,27.9 23.2,27.9 21.7,29.1 23.2,29.1 65.736,30.2 45.443,31.29 21.1,32 22.741,32 24.67,32 26.616,32 21.1,32.918 22.741,32.918 24.67,32.918 26.616,32.918 65.377,32.92 37.68,34.29 46.504,34.904 17.6,36.021 15.2,37.3 18.2,37.4 22.931,37.4 21.1,37.6 34.56,37.6 39.597,38.334 15.929,38.6 11.76,40.3 51.5,40.725 6.161,40.85 73.12,42.69 33.665,42.896 23,44.2 7.2,48.51 58.388,48.518 18.6,48.6 70.376,52.1 52.2,52.5 72.352,54.269 55.4,56.912 29.4,58.67 64.758,58.69 70.8,58.9 70.8,61.806
  other v2: 58.388,50.3
GNDA: C1.1 R3.2 R6.2 R7.1 U1.10 | length 9.6
  Top Layer w0.254: v2(17.3,17.7) 17.304,17.704 R6.2 ; C1.1 18.774,11.075 19.101,11.402 19.126,11.402 19.299,11.575 R3.2 19.185,11.714 v2(19.185,12.397) U1.10
  Bottom Layer w0.254: v2(17.3,17.7) 17.3,17.26 ccw(c17.554,17.26) 17.374,17.081 17.882,16.573 R7.1
  Bottom Layer w1: R7.1 18.32,15.465 18.9,14.885 18.9,12.397
KEY1: C23.2 P3.7 U2.14 | length 38.7
  Top Layer w0.28: U2.14 47.11,37.866 ccw(c47.39,37.866) 47.192,37.668 52.178,32.682 ccw(c52.376,32.88) 52.376,32.6 59.384,32.6 cw(c59.384,32.32) 59.582,32.518 66.718,25.382 ccw(c66.916,25.58) 66.916,25.3 69.105,25.3 cw(c69.105,25.02) 69.385,25.02 C23.2 75.2,24 P3.7
KEY2: C24.2 P3.6 U2.15 | length 37
  Top Layer w0.28: U2.15 47.61,38.44 47.615,38.412 cw(c47.34,38.36) 47.62,38.36 47.62,38.1 ccw(c47.9,38.1) 47.702,37.902 52.322,33.282 ccw(c52.52,33.48) 52.52,33.2 61.186,33.2 cw(c61.186,32.92) 61.383,33.118 66.72,27.782 ccw(c66.917,27.98) 66.917,27.7 69.105,27.7 cw(c69.105,27.42) 69.385,27.421 ; 69.385,27.421 69.385,26.89 C24.2 75.2,26.54 P3.6
KEY3: C25.2 P3.5 U2.16 | length 35.2
  Top Layer w0.28: U2.16 48.11,38.406 ccw(c48.39,38.406) 48.192,38.209 52.619,33.781 ccw(c52.816,33.98) 52.815,33.7 63.314,33.7 cw(c63.314,33.42) 63.512,33.618 66.848,30.282 66.849,30.281 ccw(c67.046,30.48) 67.046,30.2 69.105,30.2 cw(c69.105,29.92) 69.385,29.92 C25.2 75.2,29.08 P3.5
KEY4: C26.2 P3.4 U2.17 | length 34.9
  Top Layer w0.28: U2.17 50.11,37.155 ccw(c50.39,37.156) 50.191,36.959 52.869,34.281 ccw(c53.066,34.48) 53.064,34.2 65.433,34.2 cw(c65.433,33.92) 65.631,34.118 66.967,32.782 66.968,32.781 ccw(c67.165,32.98) 67.165,32.7 69.105,32.7 cw(c69.105,32.42) 69.385,32.42 C26.2 75.2,31.62 P3.4
KEY5: S2.1 S2.2 U2.20 | length 13.8
  Top Layer w0.28: U2.20 54.708,42.79 cw(c54.708,42.51) 54.906,42.708 55.019,42.595 cw(c54.82,42.398) 55.1,42.398 S2.1 S2.2
KEY6: S3.1 S3.2 U2.21 | length 23.3
  Top Layer w0.28: U2.21 57.574,43.29 ccw(c57.574,43.57) 57.771,43.371 58.388,43.988 cw(c58.586,43.79) 58.586,44.07 61.214,44.07 cw(c61.214,43.79) 61.412,43.988 S3.1 S3.2
KEY7: S4.1 S4.2 U2.22 | length 17.7
  Top Layer w0.28: U2.22 56.974,43.79 ccw(c56.974,44.07) 57.172,43.872 S4.1 S4.2
KEYLED: P3.2 U2.24 | length 41
  Top Layer w0.28: U2.24 55.909,44.79 ccw(c55.909,45.07) 56.107,44.872 59.504,48.269 cw(c59.701,48.07) 59.701,48.35 67.82,48.35 cw(c67.82,48.07) 68.1,48.07 68.1,42.18 ccw(c68.38,42.18) 68.38,41.9 73.12,41.9 cw(c73.12,41.62) 73.4,41.62 73.4,36.13 74.83,34.7 P3.2
NetC1_2: C1.2 U1.9 | length 1.4
  Top Layer w0.254: C1.2 18.135,11.925 18.308,12.098 18.308,12.123 18.658,12.473 18.658,12.616 18.685,12.642 U1.9
NetC4_1: C4.1 R5.1 | length 1.6
  Top Layer w0.6: C4.1 R5.1
NetC4_2: C4.2 L1.2 U1.7 | length 0.1
  Top Layer w0.254: U1.7@18.854,14.58 18.877,14.557 18.877,14.532 18.879,14.53 U1.7
NetC12_2: C12.2 D3.2 D4.2 S1.1 S1.2 | length 21
  Top Layer w0.28: S1.2 48.65,17.85 ; S1.1 48.65,17.85 ; C12.2 D4.2 D3.2 48.65,17.85
NetC13_1: C13.1 U2.5 Y1.2 | length 6.8
  Top Layer w0.28: C13.1 40.13,35.39 41.08,36.34 Y1.2 41.58,36.34 42.528,37.288 ccw(c42.33,37.486) 42.61,37.486 U2.5
NetC14_1: C14.1 U2.6 Y1.1 | length 11.1
  Top Layer w0.28: C14.1 40.13,33.19 41.08,32.24 Y1.1 41.58,32.24 43.029,33.689 ccw(c42.83,33.886) 43.11,33.886 U2.6
NetC15_2: C15.2 R15.1 U2.7 | length 15.3
  Top Layer w0.28: C15.2 R15.1 43.284,30.3 ccw(c43.284,30.58) 43.482,30.382 43.528,30.428 ccw(c43.33,30.626) 43.61,30.626 U2.7
NetC27_2: C27.2 D5.2 P6.8 | length 5.1
  Top Layer w1: P6.8 C27.2 D5.2@32.1,63
NetD1_A: D1.A R4.2 | length 2.5
  Top Layer w0.254: D1.A 32.21,32.095 32.675,32.56 R4.2
NetD3_1: D3.1 Q1.1 Q2.3 R8.2 | length 39.8
  Top Layer w0.28: R8.2@44.4,10.55 41.891,10.55 cw(c41.891,10.83) 41.693,10.632 41.257,11.068 cw(c41.455,11.266) 41.175,11.266 41.175,14.609 cw(c41.455,14.609) 41.257,14.807 43.023,16.573 ; D3.1 46.126,29.1 ccw(c46.126,28.82) 45.928,29.018 44.382,27.472 ccw(c44.58,27.274) 44.3,27.274 44.3,17.85 43.023,16.573 ; Q2.3 54.891,17.275 ccw(c54.891,16.995) 54.694,17.194 53.682,16.182 cw(c53.484,16.38) 53.484,16.1 43.495,16.1 43.023,16.573
NetD4_1: D4.1 R11.2 | length 3.5
  Top Layer w0.28: D4.1 52.96,29.41 53.668,30.118 cw(c53.866,29.92) 53.866,30.2 R11.2
NetP7_2: P7.2 U4.4 | length 4
  Top Layer w0.6: P7.2 7.189,35.46 7.75,36.021 U4.4
NetQ2_1: Q2.1 R10.1 R12.1 | length 3.5
  Top Layer w0.28: R10.1 R12.1 57.15,21.62 Q2.1
NetR1_1: R1.1 R3.1 U1.11 | length 2.8
  Top Layer w0.254: U1.11 19.685,12.643 19.712,12.616 19.712,12.275 19.976,12.01 19.976,11.773 R3.1 R1.1
NetR2_2: R2.2 U1.12 | length 3.9
  Top Layer w0.254: U1.12 20.724,13.08 cw(c20.724,12.826) 20.903,13.006 22.266,11.643 cw(c22.086,11.464) 22.34,11.464 R2.2
NetR5_2: R5.2 U1.8
NetR6_1: R6.1 U1.6 | length 1.1
  Top Layer w0.254: R6.1@18.039,16.854 18.685,16.208 U1.6
NetR13_1: R13.1 U2.1 | length 4.2
  Top Layer w0.28: R13.1 38.53,38.514 cw(c38.81,38.514) 38.611,38.711 39.109,39.209 cw(c39.306,39.01) 39.306,39.29 U2.1
NetR14_1: R14.1 U2.60 | length 2
  Top Layer w0.28: R14.1 U2.60
NetR16_2: R16.2 USBC1.A5 | length 7.7
  Top Layer w0.28: USBC1.A5 72.994,47.35 74.934,45.41 R16.2
NetR18_2: R18.2 USBC1.B5 | length 8.2
  Top Layer w0.28: USBC1.B5 73.35,50.35 74,51 74,53.849 R18.2@74.924,54.773 ; R18.2@74.924,54.773 R18.2 75.274,55.098 74.949,54.773 R18.2@74.924,54.773
PowerCheck: R9.1 R11.1 U2.23 | length 23.6
  Top Layer w0.28: U2.23 56.671,44.29 v2(56.97,44.589) ; R9.1 R11.1 v2(56.97,31.57)
  Bottom Layer w0.28: v2(56.97,31.57) v2(56.97,44.589)
PowerCtrl: R10.2 U2.11 | length 25
  Top Layer w0.28: U2.11 45.61,32.58 ccw(c45.89,32.58) 45.89,32.3 50.32,32.3 cw(c50.32,32.02) 50.6,32.02 50.6,27.179 ccw(c50.88,27.18) 50.88,26.9 v2(54.136,26.9) ; v2(54.136,23.7) R10.2
  Bottom Layer w0.28: v2(54.136,23.7) v2(54.136,26.9)
PowerIn: D2.2 P1.1 Q1.2 R8.1 | length 16.7
  Top Layer w3: 43.225,13 50,13 ; P1.1 50,13 ; D2.2 50,13
SPK+: LS1.1 U3.14 | length 6.1
  Top Layer w0.28: LS1.1 62.43,58.33 U3.14
SPK-: LS1.2 U3.13 | length 5.6
  Top Layer w0.28: LS1.2 63.7,59.6 U3.13
SWCLKD: P2.3 U2.49 | length 4.8
  Top Layer w0.28: P2.3 36.11,48.79 U2.49
SWDIOD: P2.2 U2.46 | length 11.3
  Top Layer w0.28: P2.2 36.16,54.6 41.11,54.6 41.61,54.1 U2.46
TM1638_CLK: P4.2 U2.38 | length 11
  Top Layer w0.28: P4.2 45.528,59.042 cw(c45.33,58.844) 45.61,58.844 U2.38
TM1638_DIO: P4.1 U2.39 | length 11.9
  Top Layer w0.28: P4.1 41.64,60.39 45.029,57.002 cw(c44.83,56.804) 45.11,56.804 U2.39
TM1638_STB: P4.3 U2.37 | length 10.2
  Top Layer w0.28: U2.37 P4.3
USART1_RX: P6.1 U2.43 | length 32.8
  Top Layer w0.28: P6.1 30.104,45.22 ccw(c30.104,45.5) 30.302,45.302 32.918,47.918 ccw(c32.72,48.116) 33,48.116 33,57.22 cw(c33.28,57.22) 33.28,57.5 42.206,57.5 cw(c42.206,57.22) 42.404,57.418 43.029,56.793 cw(c42.83,56.596) 43.11,56.596 ; U2.43 43.11,56.596
USART1_TX: P6.2 U2.42 | length 33
  Top Layer w0.28: P6.2 31.584,47.76 ccw(c31.584,48.04) 31.782,47.842 32.318,48.378 ccw(c32.12,48.576) 32.4,48.576 32.4,57.821 cw(c32.68,57.82) 32.68,58.1 42.294,58.1 cw(c42.294,57.82) 42.492,58.018 43.528,56.982 cw(c43.33,56.784) 43.61,56.784 U2.42
USART3_RX: U2.30 U3.16 | length 16.9
  Top Layer w0.28: U2.30 51.762,47.79 ccw(c51.762,48.07) 51.959,47.872 53.104,49.017 53.104,51.004 53.1,51.009 53.1,55.184 cw(c53.38,55.184) 53.182,55.382 53.818,56.018 cw(c54.016,55.82) 54.016,56.1 U3.16
USART3_TX: U2.29 U3.6 | length 27.1
  Top Layer w0.28: U2.29 52.074,47.29 ccw(c52.074,47.57) 52.271,47.371 53.6,48.7 53.6,50.078 53.6,51.941 53.6,54.831 54.389,55.62 58.611,55.62 59.095,55.136 59.095,55.13 59.643,54.582 ccw(c59.841,54.78) 59.841,54.5 65.96,54.5 cw(c65.96,54.22) 66.24,54.22 U3.6
VBTA+: D2.1 P8.1 | length 3.9
  Top Layer w3: D2.1 P8.1
VIN: C2.2 C3.2 E1.A Q1.3 R2.1 U1.1 | length 7
  Top Layer w1.5: E1.A E1.A@32.3,11.5
  Top Layer w3: E1.A@32.3,11.5 Q1.3@39.125,11.5
  other v1: 26.4,11.3 28.1,11.3 26.4,12.55 28.1,12.55 26.4,13.8 28.1,13.8
Vout: C22.2 R17.1 U3.10 U5.3 U5.7 U5.8 | length 29.1
  Top Layer w0.28: U5.8 54.595,52.88 54.842,52.632 55.354,52.632 ; R17.1 55.244,46.665 55.569,46.99 55.594,46.99 57.135,48.531 U5.3 v2(57.135,50.36) ; U5.7 55.865,53.144 55.354,52.632 ; v2(57.1,51.605) 56.382,51.605 55.354,52.632
  Top Layer w0.5: U3.10 67.51,54.4 v2(67.66,54.25) 67.81,54.1 69.822,54.1 70.115,54.393 70.115,54.519 70.445,54.849 C22.2
  Bottom Layer w0.28: v2(57.135,50.36) 57.112,50.383 57.112,50.468 57.1,50.48 v2(57.1,51.605) 65.015,51.605 v2(67.66,54.25)
WS2812CLK: U2.58 U4.2 | length 32.5
  Top Layer w0.28: U4.2 8.7,41.92 cw(c8.98,41.92) 8.98,42.2 30.384,42.2 ccw(c30.384,42.48) 30.582,42.282 32.508,44.208 cw(c32.706,44.01) 32.706,44.29 U2.58
pads on no net: EARTH1.1 EARTH2.1 EARTH3.1 EARTH4.1 P5.1 P5.2 P5.3 P5.4 P5.5 P5.6 P5.7 P5.8 P6.3 P6.4 P6.5 P6.6 U1.3 U1.4 U2.2 U2.3 U2.4 U2.8 U2.9 U2.10 U2.25 U2.26 U2.27 U2.28 U2.33 U2.34 U2.35 U2.36 U2.40 U2.41 U2.44 U2.45 U2.50 U2.51 U2.52 U2.53 U2.54 U2.55 U2.56 U2.57 U2.59 U2.61 U2.62 U3.7 U3.9 U3.15 USBC1.A4 USBC1.A8 USBC1.A9 USBC1.B4 USBC1.B8 USBC1.B9 VR1.4

## Polygon pours and split planes (outlines as drawn)
VIN on Top Layer "NONET_L-01_P-001" (solid, pour order 9): 20.022,14.27 19.985,14.233 19.985,13.805 20.835,13.805 22.89,11.75 22.89,10.142 23.032,10 33.15,10 33.15,13 32.3,13 30.915,14.385 20.995,14.385 20.88,14.27
GND on Top Layer "NONET_L-01_P-001" (solid, pour order 8): 19.985,14.905 32.107,14.905 33.452,16.249 33.452,30.238 20.338,30.238 19.485,29.385 19.485,21.062 20.634,19.913 20.634,15.475 20.314,15.155 19.985,15.155
NetC4_2 on Top Layer "NONET_L-01_P-001" (solid, pour order 3): 18.756,14.857 19.197,14.405 17.791,14.405 16.546,13.16 10.54,13.16 9.065,14.635 9.065,17.416 16.595,17.416 17.2,16.811 17.2,16.401
NetR5_2 on Top Layer "NONET_L-01_P-001" (solid, pour order 2): 18.835,13.7 18.295,13.7 16.88,12.285 15.995,12.285 15.995,12.935 16.915,12.935 18.135,14.155 18.835,14.155
GND on Top Layer "NONET_L-01_P-001" (solid, pour order 7): 0,56.363 28.263,56.363 28.3,56.4 28.3,62 32.708,62 35.708,65 77.75,65 80,62.75 80,20.3 79.6,19.9 37.1,19.9 37,20 37,29.3 36.062,30.238 20.687,30.238 18.525,32.4 9.6,32.4 7.1,29.9 7.1,19.7 0.005,19.7 0,19.705
+4.68V on Top Layer "NONET_L-01_P-001" (solid, pour order 4): 19.358,16.543 19.984,17.169 19.984,19.921 18.85,21.055 18.85,27.63 18.99,27.77 18.99,29.5 18.252,30.238 11.02,30.238 9.065,28.283 9.065,19.166 9.881,18.35 18.354,18.35 18.677,18.027 18.677,16.862 19.009,16.53 19.035,16.504 19.035,16.305 19.035,15.63 19.358,15.63
VIN on Bottom Layer "NONET_L-01_P-001" (solid, pour order 0): 20.022,14.27 19.985,14.233 19.985,13.805 20.835,13.805 22.89,11.75 22.89,10.142 23.032,10 33.15,10 33.15,13 32.3,13 30.915,14.385 20.995,14.385 20.88,14.27
GND on Bottom Layer "NONET_L-01_P-001" (solid, pour order 1): 19.985,14.905 32.107,14.905 33.452,16.249 33.452,30.238 20.338,30.238 19.485,29.385 19.485,21.062 20.634,19.913 20.634,15.475 20.314,15.155 19.985,15.155
GND on Bottom Layer "NONET_L-01_P-001" (solid, pour order 6): 0,56.363 28.263,56.363 28.3,56.4 28.3,62 32.708,62 35.708,65 77.75,65 80,62.75 80,20.3 79.6,19.9 37.1,19.9 37,20 37,29.3 36.062,30.238 20.687,30.238 18.525,32.4 9.6,32.4 7.1,29.9 7.1,19.7 0.005,19.7 0,19.705
+3V3 on Bottom Layer "NONET_L-01_P-001" (solid, pour order 5): 38.61,50.79 38.61,39.21 38.611,39.209 50.096,39.209 50.11,39.223 50.11,50.79

## Silkscreen, mask and mechanical layers (free items; w line width, h text height)
Top Overlay:
  lines w0.254: 2.35,31.45 2.35,39.5 ; 28.27,45.356 31,45.356 ; 28.362,58.012 31,58.012 ; 29.635,45.356 29.635,57.966 ; 29.635,52.31 31,52.31 ; 29.635,55.38 31,55.38 ; 29.843,48.818 31,48.818 ; 38.498,57.5 38.498,55.48 ; 41.569,55.469 41.569,57.5 ; 44.889,55.501 44.889,57.5 ; 47.9,55.507 47.9,57.5 ; 51.421,55.582 51.421,57.5 ; 53.694,57.5 53.694,55.56 ; 58.35,38.05 68.35,38.05 ; 63.35,38.05 63.35,44.55 ; 65.4,63.078 70.085,63.078 ; 67.743,63.078 67.743,64.5 ; 70.3,18.3 73.7,18.3 ; 70.3,34.5 73.68,34.5 ; 70.309,18.32 70.309,34.52 ; 72.015,18.32 72.015,34.52 ; 72.015,20.553 73.711,20.553 ; 72.015,22.738 73.711,22.738 ; 72.015,25.022 73.678,25.022 ; 72.015,27.07 73.722,27.07 ; 72.015,30.501 73.7,30.501 ; 72.015,32.37 73.722,32.37 ; 73.722,18.32 73.722,34.52 ; 38.498,55.48 38.498,53.47 53.624,53.47 53.694,53.541 53.694,55.56 ; 38.498,55.48 53.614,55.48 53.694,55.56 ; 0.5,31.4 4.1,31.4 4.2,31.5 4.2,39.5 0.5,39.5 0.5,31.4 ; 10.45,41.77 10.45,43.95 28.27,43.95 28.27,41.77 10.45,41.77 ; 65.4,61.655 70.085,61.655 70.085,64.5 65.4,64.5 65.4,61.655 ; 68,42.75 68,49.8 70.3,49.8 70.3,42.75 68,42.75
  text "-" at 68.73,63.539 h1.52
  text "+" at 66.24,63.399 h1.52
  text "喇叭" at 66.61,61.756 h1.52
  text "+3" at 29.872,57.17 h1.52 r270
  text "GND" at 48.12,56.054 h1.52
  text "DIO" at 39.025,56.035 h1.52
  text "CLK" at 42,56.034 h1.52
  text "STB" at 45.1,56.035 h1.52
  text "+4" at 51.72,56.035 h1.52
  text "程序烧录口" at 28.541,55.9 h1.52 r270
  text "DIO" at 29.854,54.951 h1.52 r270
  text "显示接口" at 43.4,54.025 h1.52
  text "CLK" at 29.835,51.903 h1.52 r270
  text "语音下载口" at 68.631,49.6 h1.52 r270
  text "GND" at 29.837,48.39 h1.52 r270
  text "肖工造物" at 1.702,46.778 h2
  text "远程 / 打印输出  / OTA" at 12.4,42.435 h1.52
  text "+3" at 27.75,39.438 h1.52
  text "GND" at 2.718,39.19 h1.52 r270
  text "灯带控制口" at 0.935,38.749 h1.52 r270
  text "DI" at 2.7,35.58 h1.52 r270
  text "+4" at 72.445,34.12 h1.52 r270
  text "+4" at 2.7,33.26 h1.52 r270
  text "按键灯控制 / 按键输入" at 70.681,32.92 h1.52 r270
  text "DI" at 72.445,32.01 h1.52 r270
  text "GND" at 72.464,30.22 h1.52 r270
  text "G" at 26.5,28.498 h1.52
  text "+4" at 13.6,28.48 h1.52
  text "K4" at 72.445,26.83 h1.52 r270
  text "K3" at 72.464,24.65 h1.52 r270
  text "K2" at 72.445,22.42 h1.52 r270
  text "K1" at 72.445,20.22 h1.52 r270
  text "电池输入" at 65.8,6.835 h1.52
  text "灯带消消乐V1" at 17.604,3.056 h4
  text "电源适配器输入" at 55.407,1.016 h1.52
Bottom Solder:
  lines w1.5: 33.6,15.1 34.9,13.9 ; 37.3,13.6 42,13.6 ; 44.6,13.6 47.8,13.6 ; 50,13.6 53.7,13.6 ; 56,13.6 58.4,13.6 ; 60.9,16.1 62.5,17.7 63.6,17.7
Mechanical 1:
  the board outline again, w0.254